# Altium PCB ADM32F036A2Q_BLDC_Demo_Rev1.0.pcbdoc (part 2 of 2)
Units mm, origin at the board's own origin, x right, y up, seen from the top; angles counter-clockwise.
Board outline 100 x 60 mm, 4 copper layers (Top Layer, S1, S2, Bottom Layer), stack 0.778 mm thick; 149 components, 80 nets, 408 pads, 387 vias.
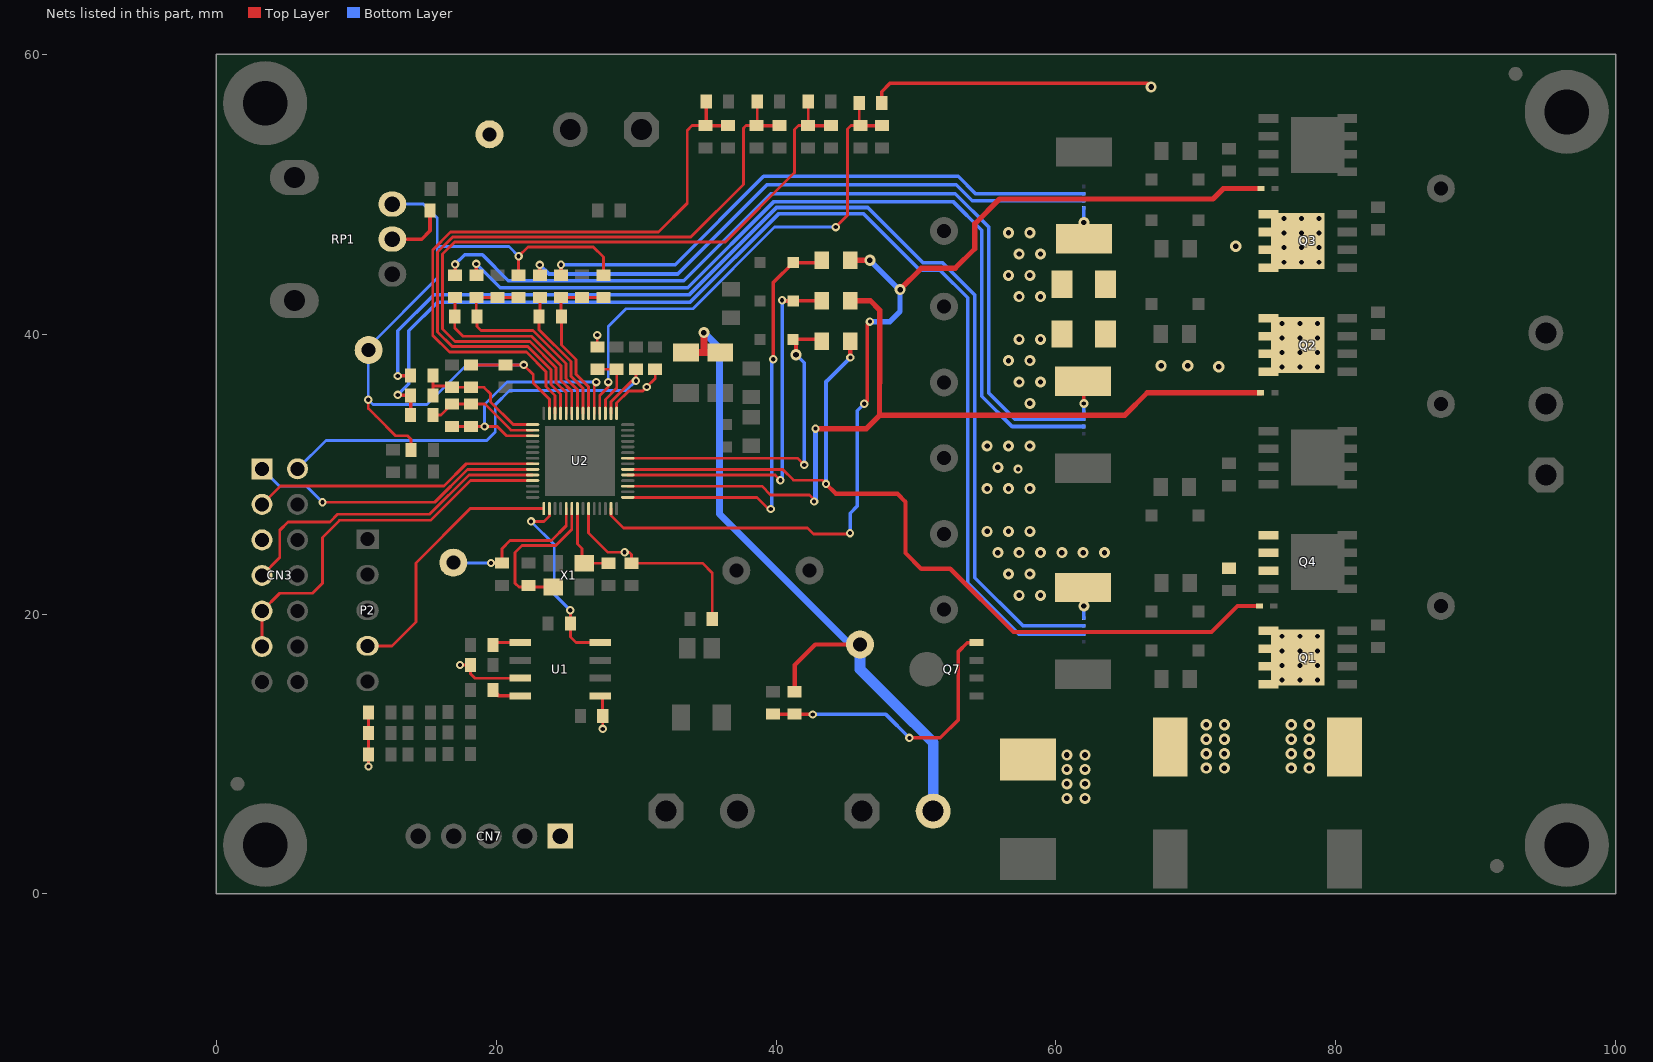
[diagram p4: the nets of this part, all layers, seen from the top]

## Via types
v1: diameter 0.6, hole 0.3, Top Layer to Bottom Layer, tented both sides, 130 vias
v2: diameter 0.787, hole 0.381, Top Layer to Bottom Layer, tented both sides, 106 vias
v3: diameter 0.66, hole 0.356, Top Layer to Bottom Layer, tented bottom, 72 vias
v4: diameter 0.8, hole 0.4, Top Layer to Bottom Layer, tented both sides, 68 vias
v5: diameter 0.635, hole 0.305, Top Layer to Bottom Layer, tented both sides, 4 vias
v6: diameter 0.787, hole 0.381, Top Layer to Bottom Layer, tented bottom, 4 vias
v7: diameter 0.5, hole 0.3, Top Layer to Bottom Layer, tented both sides, 3 vias

## Nets (pads, with @x,y where several pads share a name; then routed paths per layer and width w, separated by ;. In a path a pad name is that pad's centre, name@x,y a point inside that pad or via, vN(x,y) a via of type N, cw(c..) or ccw(c..) an arc to the next point about the centre after c; other vN are vias at no path point) (continued)
NetQ7_1: Q7.1 R5.2 R9.1 | length 20.9
  Top Layer w0.254: R9.1@39.786,12.855 R5.2@41.335,12.855 41.363,12.827 v1(42.621,12.827) ; v1(49.53,11.151) 51.74,11.151 53.035,12.446 53.035,17.323 53.67,17.958 Q7.1@54.331,17.958
  Bottom Layer w0.254: v1(42.621,12.827) 47.854,12.827 v1(49.53,11.151)
NetR44_2: R44.2 U1.1 | length 2
  Top Layer w0.203: R44.2@19.774,17.805 19.926,17.958 U1.1@21.73,17.958
NetR54_1: R54.1 RP1.2 | length 4.4
  Top Layer w0.254: RP1.2@12.588,46.787 14.681,46.787 15.278,47.384 R54.1@15.278,48.844
NetR59_2: R59.2 U1.4 | length 2.1
  Top Layer w0.254: R59.2@19.774,14.58 20.206,14.148 U1.4@21.73,14.148
OP1N: R30.1 R31.2 R33.2 U2.2 | length 8.2
  Top Layer w0.2: R31.2@15.493,34.233 16.073,34.233 R33.2@16.845,35.005 R30.1@18.217,35.005 19.202,35.005 21.07,33.137 U2.2@22.61,33.137
OP1OUT: R30.2 R33.1 U2.3 U2.47 | length 18.6
  Top Layer w0.203: R33.1@16.845,33.405 R30.2@18.217,33.405 18.221,33.401 v1(19.177,33.401) 20.083,33.401 20.087,33.405 20.755,32.737 U2.3@22.61,32.737 ; U2.47@27.01,34.337 27.01,36.433 v1(27.153,36.576)
  Bottom Layer w0.203: v1(19.177,33.401) 19.177,34.98 20.773,36.576 v1(27.153,36.576)
OP1P: C9.2 R37.2 R38.2 R40.1 U2.1 | length 10
  Top Layer w0.2: C9.2@15.493,35.63 15.493,36.297 ; R37.2@15.493,37.027 15.493,36.297 ; U2.1@22.61,33.537 21.225,33.537 19.609,35.154 19.609,35.738 19.148,36.199 R40.1@18.217,36.199 R38.2@16.845,36.199 16.747,36.297 15.493,36.297
PGA1N: C4.2 R24.1 U2.49 | length 9.6
  Top Layer w0.203: R24.1@23.125,42.611 23.125,41.299 C4.2@23.076,41.25 23.076,40.312 25.351,38.037 25.351,36.988 26.21,36.129 U2.49@26.21,34.337
PGA1P: C4.1 R17.2 R18.1 R21.1 U2.48 | length 12.1
  Top Layer w0.2: U2.48@26.61,34.337 26.6,34.347 26.6,36.239 25.705,37.135 25.705,38.184 24.676,39.213 C4.1@24.676,41.25 24.639,41.287 R21.1@24.639,42.611 R17.2@26.153,42.611 R18.1@27.667,42.611
PGA2N: C5.2 R29.1 U2.51 | length 14.6
  Top Layer w0.203: R29.1@17.069,42.611 17.069,41.275 C5.2@17.044,41.25 17.044,40.437 17.628,39.853 22.53,39.853 24.64,37.743 24.64,36.694 25.41,35.924 U2.51@25.41,34.337
PGA2P: C5.1 R25.2 R26.1 R27.1 U2.50 | length 16.5
  Top Layer w0.203: R26.1@21.611,42.611 R25.2@20.097,42.611 R27.1@18.583,42.611 18.583,41.31 C5.1@18.644,41.25 18.644,40.538 18.923,40.259 22.626,40.259 24.995,37.89 24.995,36.841 25.81,36.026 U2.50@25.81,34.337
R+: C2.2 C3.2 NT6.2 NT7.2 NT8.2 Q4.1 Q4.2 Q4.3 R14.1 RS1.1 RS2.1 RS3.2 | length 6.7
  Top Layer w0.254: RS3.2@61.944,21.896 61.995,21.845 v6(61.995,20.574) ; RS1.1@61.944,36.628 61.995,36.577 v5(61.995,35.052) ; v6(61.995,47.981) 61.995,46.816 RS2.1@62,46.811
  Bottom Layer w0.254: v6(61.995,20.574) 62,20.569 NT8.2@62,19.685 ; v5(61.995,35.052) 62,35.047 NT6.2@62,34.417 ; v6(61.995,47.981) 62,47.986 NT7.2@62,49.022
  other v2: 57.372,21.336 58.896,21.336 56.61,22.86 58.134,22.86 55.848,24.384 57.372,24.384 58.896,24.384 60.42,24.384 61.944,24.384 63.468,24.384 55.086,25.908 56.61,25.908 58.134,25.908 55.086,28.956 56.61,28.956 58.134,28.956 55.848,30.48 55.086,32.004 56.61,32.004 58.134,32.004 58.134,35.052 57.372,36.576 58.896,36.576 56.61,38.1 58.134,38.1 57.372,39.624 58.896,39.624 57.372,42.672 58.896,42.672 56.61,44.196 58.134,44.196 57.372,45.72 58.896,45.72 56.61,47.244 58.134,47.244
  other v5: 57.302,30.353
SIMO: P2.4 U2.15 | length 19.1
  Top Layer w0.203: P2.4@10.82,17.729 12.573,17.729 14.275,19.431 14.275,23.655 18.157,27.537 U2.15@23.41,27.537
SNRS3: C9.1 NT9.1 R31.1 | length 83.3
  Top Layer w0.254: v1(12.979,35.662) 13.011,35.63 C9.1@13.893,35.63 R31.1@13.893,34.233
  Bottom Layer w0.254: v1(12.979,35.662) 13.767,36.449 13.767,40.234 15.824,42.291 33.884,42.291 40.208,48.616 46.221,48.616 50.26,44.577 51.701,44.577 53.689,42.589 53.689,22.225 57.372,18.542 NT9.1@62,18.542
SNV: NT6.1 R29.2 | length 63
  Top Layer w0.254: R29.2@17.069,44.211 v1(17.069,44.983)
  Bottom Layer w0.254: v1(17.069,44.983) 17.755,45.669 19.025,45.669 20.879,43.815 33.401,43.815 39.62,50.035 52.803,50.035 55.213,47.625 55.213,35.77 57.074,33.909 NT6.1@62.001,33.909
SNW: NT7.1 R24.2 | length 43
  Top Layer w0.254: R24.2@23.125,44.211 v1(23.125,44.947)
  Bottom Layer w0.254: v1(23.125,44.947) 23.774,44.298 32.981,44.298 39.356,50.673 52.883,50.673 54.026,49.53 NT7.1@62,49.53
SPRS3: NT8.1 R37.1 | length 81
  Top Layer w0.254: v1(12.979,37.008) 12.998,37.027 R37.1@13.893,37.027
  Bottom Layer w0.254: v1(12.979,37.008) 12.979,40.234 15.545,42.799 33.781,42.799 40.029,49.047 46.552,49.047 50.514,45.085 51.911,45.085 54.197,42.799 54.197,22.606 57.626,19.177 NT8.1@62,19.177
SPV: NT4.1 R27.2 | length 61.1
  Top Layer w0.254: R27.2@18.583,44.211 v1(18.583,45.019)
  Bottom Layer w0.254: v1(18.583,45.019) 20.295,43.307 33.688,43.307 39.853,49.472 52.647,49.472 54.705,47.415 54.705,35.56 56.864,33.401 NT4.1@62.001,33.401
SPW: NT5.1 R21.2 | length 41.2
  Top Layer w0.254: R21.2@24.639,44.211 v1(24.639,44.959)
  Bottom Layer w0.254: v1(24.639,44.959) 32.798,44.959 39.109,51.27 53.023,51.27 54.254,50.038 NT5.1@62,50.038
STB: R60.2 U1.8 U2.16 | length 13.7
  Top Layer w0.203: v1(22.504,26.619) 23.414,26.619 23.81,27.015 U2.16@23.81,27.537 ; v1(25.298,20.269) 25.311,20.257 R60.2@25.311,19.329 25.311,18.352 25.705,17.958 U1.8@27.445,17.958
  Bottom Layer w0.203: v1(22.504,26.619) 24.155,24.968 24.155,21.412 v1(25.298,20.269)
TCK: CN3.9 CN3.11 U2.11 | length 27.7
  Top Layer w0.2: CN3.11@3.277,17.678 CN3.9@3.277,20.218 4.547,21.488 6.883,21.488 7.595,22.2 7.595,25.476 8.814,26.695 15.32,26.695 18.162,29.537 U2.11@22.61,29.537
TDI: CN3.3 U2.8 | length 20.5
  Top Layer w0.2: CN3.3@3.277,27.838 4.597,29.159 16.288,29.159 17.866,30.737 U2.8@22.61,30.737
TDO: CN3.7 U2.10 | length 23.5
  Top Layer w0.2: CN3.7@3.277,22.758 4.547,24.028 4.547,25.984 5.131,26.568 8.121,26.568 8.68,27.127 15.253,27.127 18.063,29.937 U2.10@22.61,29.937
TMS: CN3.1 U2.9 | length 21.3
  Top Layer w0.2: v1(7.595,27.991) 15.618,27.991 17.965,30.337 U2.9@22.61,30.337
  Bottom Layer w0.2: CN3.1@3.277,30.378 4.521,29.134 6.452,29.134 v1(7.595,27.991)
TRSTn: CN3.2 R22.2 U2.44 | length 32
  Top Layer w0.2: U2.44@28.21,34.337 28.21,35.169 29.71,36.669 v1(29.989,36.669) R22.2@29.989,37.489
  Bottom Layer w0.2: CN3.2@5.817,30.378 7.849,32.41 19.329,32.41 19.939,33.02 19.939,34.95 20.961,35.973 29.293,35.973 v1(29.989,36.669)
U: C12.1 NT1.1 U2.34 | length 63.8
  Top Layer w0.2: U2.34@29.41,30.337 40.478,30.337 41.25,29.566 43.307,29.566 v1(43.574,29.299)
  Top Layer w0.305: v1(43.574,29.299) 44.277,28.596 48.671,28.596 49.251,28.016 49.251,24.359 50.368,23.241 52.451,23.241 56.972,18.72 71.12,18.72 72.974,20.574 NT1.1@74.549,20.574 ; C12.1@45.307,39.497 45.307,38.335 v1(45.314,38.329)
  Bottom Layer w0.305: v1(43.574,29.299) 43.574,36.589 v1(45.314,38.329)
V: C13.1 NT2.1 U2.31 | length 61.9
  Top Layer w0.2: U2.31@29.41,29.137 38.995,29.137 39.618,28.515 42.402,28.515 42.723,28.194 v1(42.723,28.042)
  Top Layer w0.381: v1(42.824,33.249) 46.457,33.249 47.389,34.181 ; C13.1@45.307,42.386 46.742,42.386 47.404,41.724 47.404,36.525 47.389,36.509 47.389,34.181 ; NT2.1@74.625,35.814 66.523,35.814 64.922,34.214 47.422,34.214 47.389,34.181
  Bottom Layer w0.381: v1(42.723,28.042) 42.824,28.143 v1(42.824,33.249)
VBU: C12.2 D8.K U2.36 | length 24.2
  Top Layer w0.2: U2.36@29.41,31.137 41.532,31.137 v1(42.012,30.658)
  Top Layer w0.254: v4(41.427,38.532) 41.427,39.407 D8.K@41.21,39.624 43.148,39.624 C12.2@43.275,39.497
  Bottom Layer w0.254: v4(41.427,38.532) 42.012,37.948 v1(42.012,30.658)
VBV: C13.2 D9.K U2.33 | length 26.8
  Top Layer w0.2: U2.33@29.41,29.937 39.938,29.937 v1(40.31,29.566)
  Top Layer w0.254: v1(40.437,42.418) 40.488,42.367 D9.K@41.224,42.367 41.243,42.386 C13.2@43.275,42.386
  Bottom Layer w0.254: v1(40.31,29.566) 40.437,29.693 v1(40.437,42.418)
VBW: C15.2 D11.K U2.29 | length 31
  Top Layer w0.2: U2.29@29.41,28.337 38.643,28.337 39.472,27.508 v1(39.624,27.508)
  Top Layer w0.254: v1(39.807,38.206) 39.807,43.693 D11.K@41.224,45.11 43.11,45.11 C15.2@43.275,45.276
  Bottom Layer w0.254: v1(39.624,27.508) 39.634,27.508 39.68,27.462 39.68,38.079 v1(39.807,38.206)
VDD: C21.1 TP14.1 U2.19 | length 11
  Top Layer w0.203: v1(19.634,23.647) C21.1@20.422,23.647 20.422,24.663 21.006,25.248 23.952,25.248 25.01,26.305 U2.19@25.01,27.537
  Bottom Layer w0.203: TP14.1@16.942,23.673 16.967,23.647 v1(19.634,23.647)
VDD5V: CN3.5
VDDA: C8.1 R18.2 R26.2 R40.2 R48.2 RP1.3 TP15.1 U2.55 | length 59.8
  Top Layer w0.2: v1(10.871,35.306) 10.871,34.678 11.41,34.139 11.413,34.139 12.811,32.741 13.665,32.741 13.918,32.488 R48.2@13.918,31.725 ; R40.2@18.217,37.799 C8.1@20.676,37.799 v1(21.971,37.799) 22.657,37.113 22.657,36.5 23.81,35.347 U2.55@23.81,34.337 ; R26.2@21.611,44.211 v1(21.611,45.563) 22.281,46.233 26.945,46.233 27.667,45.51 R18.2@27.667,44.211
  Bottom Layer w0.2: RP1.3@12.588,49.287 14.797,49.287 15.799,48.285 15.799,46.253 ; v1(21.611,45.563) 20.921,46.253 15.799,46.253 ; v1(21.971,37.799) 17.885,37.799 15.061,34.975 11.202,34.975 v1(10.871,35.306) 10.871,39.091 15.799,44.018 15.799,46.253
VDDIO: C11.1 C16.1 C29.1 C32.1 CN7.1 R4.1 R43.1 R49.1 R51.1 R52.1 TP13.1 U1.3 U1.5 U2.23 U2.43 | length 32.8
  Top Layer w0.2: v1(10.884,9.106) R49.1@10.884,9.96 R51.1@10.884,11.506 R52.1@10.884,12.982 ; v1(17.424,16.358) C32.1@18.174,16.358 18.174,15.735 18.491,15.418 U1.3@21.73,15.418 ; U2.23@26.61,27.537 26.61,25.791 27.991,24.409 v1(29.185,24.409) 29.515,24.409 29.667,24.257 C16.1@29.667,23.635 34.735,23.635 35.448,22.921 R4.1@35.448,19.653 ; R43.1@27.229,39.089 v1(27.229,39.929) ; U1.5@27.445,14.148 27.61,13.983 C29.1@27.61,12.421 ; v1(27.622,11.798) C29.1@27.622,12.725 ; U2.43@28.61,34.337 28.61,35.071 29.48,35.941 30.48,35.941 v1(30.759,36.22) 31.369,36.83 C11.1@31.369,37.489
VM: C2.1 C3.1 CN1.2 D4.2 E1.1 E2.1 Q1.5 Q1.6 Q1.7 Q1.8 Q1.9 Q2.5 Q2.6 Q2.7 Q2.8 Q2.9 Q3.5 Q3.6 Q3.7 Q3.8 Q3.9 R5.1 R34.2 R41.2 R50.1 TP1.1 | length 74.2
  Top Layer w0.254: R50.1@47.55,56.515 47.55,57.329 48.133,57.912 66.548,57.912 v4(66.802,57.658) ; Q3.6@75.302,47.244 Q3.9@76.284,46.262
  Top Layer w0.3: R5.1@41.335,14.455 41.335,16.367 42.799,17.831 TP1.1@45.999,17.831
  Top Layer w0.5: R41.2@33.579,38.686 34.823,38.686 ; v4(34.849,40.107) 34.849,38.686 R34.2@36.017,38.686
  Bottom Layer w0.5: v4(34.849,40.107) 35.966,38.989 35.966,27.153 45.288,17.831 TP1.1@45.999,17.831
  Bottom Layer w0.762: TP1.1@45.999,17.831 45.999,16.053 49.865,12.187 49.871,12.187 51.232,10.826 CN1.2@51.232,5.918
  other v3: 76.168,15.291 77.425,15.291 78.683,15.291 76.168,16.332 77.425,16.332 78.683,16.332 76.168,17.374 77.425,17.374 78.683,17.374 76.168,18.415 77.425,18.415 78.683,18.415 76.168,37.643 77.425,37.643 78.683,37.643 76.168,38.684 77.425,38.684 78.683,38.684 76.168,39.726 77.425,39.726 78.683,39.726 76.168,40.767 77.425,40.767 78.683,40.767 76.295,45.136 77.552,45.136 78.81,45.136 76.295,46.177 77.552,46.177 78.81,46.177 76.295,47.219 77.552,47.219 78.81,47.219 76.295,48.26 77.552,48.26 78.81,48.26
  other v4: 60.782,6.833 62.078,6.833 60.782,7.866 62.078,7.866 60.782,8.898 62.078,8.898 70.739,8.992 72.034,8.992 76.81,8.992 78.105,8.992 60.782,9.931 62.078,9.931 70.739,10.025 72.034,10.025 76.81,10.025 78.105,10.025 70.739,11.057 72.034,11.057 76.81,11.057 78.105,11.057 70.739,12.09 72.034,12.09 76.81,12.09 78.105,12.09 71.628,37.668 67.513,37.744 69.418,37.744 72.847,46.279
VSENU: C14.2 R19.2 R23.1 U2.54 | length 48.1
  Top Layer w0.203: U2.54@24.21,34.337 24.21,35.619 23.571,36.258 23.571,37.307 22.167,38.711 16.661,38.711 15.47,39.902 15.47,46.014 16.751,47.295 31.598,47.295 33.655,49.352 33.655,54.559 33.998,54.902 R23.1@34.97,54.902
  Top Layer w0.254: R19.2@35.014,56.604 35.014,54.946 R23.1@34.97,54.902 C14.2@36.576,54.902
VSENV: C19.2 R32.2 R39.1 U2.53 | length 50.6
  Top Layer w0.203: U2.53@24.61,34.337 24.61,35.722 23.932,36.4 23.932,37.45 22.264,39.118 16.864,39.118 15.826,40.156 15.826,45.867 16.898,46.939 33.909,46.939 37.668,50.698 37.668,54.712 37.859,54.902 R39.1@38.608,54.902 38.659,54.953 R32.2@38.659,56.604
  Top Layer w0.254: R39.1@38.608,54.902 C19.2@40.246,54.902
VSENVM: C30.2 R50.2 R58.1 U2.46 | length 37.2
  Top Layer w0.203: U2.46@27.41,34.337 27.41,35.614 28.016,36.22 v1(28.016,36.576) ; v1(44.272,47.65) 45.11,48.489 45.11,54.661 45.352,54.902 C30.2@46.041,54.902 45.95,54.993 R50.2@45.95,56.515
  Top Layer w0.254: C30.2@46.041,54.902 R58.1@47.565,54.902
  Bottom Layer w0.203: v1(28.016,36.576) 28.016,40.538 29.286,41.808 34.061,41.808 39.903,47.65 v1(44.272,47.65)
VSENW: C22.2 R45.2 R46.1 U2.52 | length 53.2
  Top Layer w0.2: U2.52@25.01,34.337 25.01,35.823 24.286,36.547 24.286,37.596 22.41,39.472 17.069,39.472 16.18,40.361 16.18,45.72 17.045,46.585 36.374,46.585 41.326,51.537 41.326,54.61 41.618,54.902 R46.1@42.291,54.902 42.305,54.916 R45.2@42.305,56.604
  Top Layer w0.254: R46.1@42.291,54.902 C22.2@43.942,54.902
W: C15.1 NT3.1 U2.27 | length 72.1
  Top Layer w0.2: U2.27@28.21,27.537 28.21,27.035 29.097,26.148 42.255,26.148 42.691,25.711 45.218,25.711 v1(45.288,25.781)
  Top Layer w0.254: v1(46.304,35.027) 46.533,35.255 46.533,40.716 v1(46.711,40.894)
  Top Layer w0.381: C15.1@45.307,45.276 v4(46.704,45.276) ; v4(48.863,43.18) 50.387,44.704 52.8,44.704 54.197,46.101 54.197,47.879 55.975,49.657 71.215,49.657 71.958,50.4 NT3.1@74.644,50.4
  Bottom Layer w0.254: v1(45.288,25.781) 45.288,26.513 45.293,26.518 45.293,27.21 45.801,27.718 45.801,34.523 v1(46.304,35.027)
  Bottom Layer w0.381: v4(46.704,45.276) 48.8,43.18 v4(48.863,43.18) 48.863,41.624 48.133,40.894 v1(46.711,40.894)
X1: C10.2 U2.21 X1.3 | length 5.9
  Top Layer w0.203: U2.21@25.81,27.537 25.81,25.016 26.146,24.679 26.146,23.784 X1.3@26.297,23.634 ; X1.3@26.297,23.634 C10.2@28.042,23.635
X2: C17.2 U2.20 X1.1 | length 11.3
  Top Layer w0.203: X1.1@24.097,21.934 21.627,21.934 21.361,22.2 21.361,24.409 21.844,24.892 24.257,24.892 25.41,26.045 U2.20@25.41,27.537
XRS: C28.2 R43.2 U2.45 | length 4.9
  Top Layer w0.203: R43.2@27.229,37.489 C28.2@28.609,37.489 28.621,37.477 28.621,36.139 27.81,35.328 U2.45@27.81,34.337
pads on no net: CN3.6 CN3.13 CN3.14 M1.0 M2.0 M3.0 RP1.0 U2.6

## Polygon pours and split planes (outlines as drawn)
GND on Top Layer "i" (solid, remove dead copper, pour order 122): 100,51.613 92.745,51.613 91.135,53.222 91.135,56.801 89.745,58.191 56.261,58.191 55.448,57.379 55.448,52.73 51.943,49.225 38.735,49.225 36.22,46.711 36.22,33.223 34.976,31.979 32.69,31.979 29.845,29.134 29.845,0 29.87,-0.025 99.975,-0.025 100,0 100,51.562 99.974,51.587
VM on Top Layer "Top Overlay-No Net" (solid, remove dead copper, pour order 92): 49.428,4.521 60.909,4.521 63.373,6.985 85.852,6.985 85.979,7.112 85.954,7.137 85.954,13.487 79.426,13.487 79.324,13.589 79.324,19.538 73.54,19.538 71.171,17.168 71.171,14.199 65.989,14.199 65.989,14.173 65.278,13.462 65.278,12.573 60.198,12.573 59.207,11.582 56.312,11.582 55.575,10.846 50.846,10.846 49.428,9.428
R+ on Top Layer "i" (solid, remove dead copper, pour order 64): 66.98,45.517 66.98,48.082 66.243,48.819 56.28,48.819 53.594,46.133 53.594,24.606 55.042,23.158 55.042,21.38 56.864,19.558 64.865,19.558 65.779,20.472 66.65,20.472 66.65,22.53 67.031,22.911 70.002,22.911 70.028,22.885 73.025,22.885 73.304,22.606 76.149,22.606 76.175,22.581 76.175,28.753 76.098,28.677 69.875,28.677 69.647,28.448 69.723,28.372 69.723,26.695 70.155,26.264 59.157,26.264 59.131,26.289 59.131,34.798 59.106,34.823 64.567,34.823 64.618,34.773 64.618,38.075 64.77,38.227 61.468,38.227 61.417,38.278 61.417,45.339 66.777,45.339 66.929,45.491
MOTW on Top Layer "i" (solid, remove dead copper, pour order 26): 76.549,50.218 76.549,58.54 89.469,58.54 89.469,58.467 91.147,56.79 91.147,53.211 93.964,50.394 95.225,50.394 95.225,50.371 98.259,47.337 98.259,38.608 93.694,38.608 93.694,41.656 91.916,43.434 79.978,43.434 79.978,50.184 79.985,50.19 76.577,50.19
NetNT4_2 on Top Layer "i" (solid, remove dead copper, pour order 16): 76.073,35.56 66.954,35.56 65.176,33.782 59.309,33.782 59.309,27.051 66.825,27.051 67.484,27.71 67.484,29.638 67.691,29.845 76.073,29.845
VM on Top Layer "i" (solid, remove dead copper, pour order 14): 79.629,49.403 79.629,36.576 64.897,36.576 64.77,36.449 64.77,38.227 62.484,38.227 62.357,38.354 62.357,45.085 70.104,45.085 70.866,45.847 70.866,48.133 71.247,48.133 72.39,49.276 79.375,49.276 79.502,49.403
NetNT5_2 on Top Layer "i" (solid, remove dead copper, pour order 12): 76.2,52.451 76.2,57.277 75.413,58.064 55.474,58.064 55.474,51.689 66.294,51.689 67.056,52.451 67.056,53.721 70.104,53.721 70.104,52.451
MOTU on Top Layer "i" (solid, remove dead copper, pour order 4): 79.724,14.224 99.873,14.224 100,14.351 100,31.674 91.459,31.674 90.5,30.715 90.5,28.854 87.833,26.187 76.549,26.187 76.549,20.32 76.93,19.939 79.724,19.939
MOTV on Top Layer "i" (solid, remove dead copper, pour order 2): 79.978,43.053 91.916,43.053 93.44,41.529 93.44,38.227 98.266,38.227 98.266,32.131 91.161,32.131 90.068,31.039 90.068,29.083 87.655,26.67 76.549,26.67 76.549,36.195 79.978,36.195
NetCN1_1 on Top Layer "Top Overlay-No Net" (solid, remove dead copper, pour order 94): 61.011,4.039 61.036,4.064 61.036,-0.051 42.647,-0.051 42.596,0 42.621,0.025 42.621,11.76 49.352,18.491 52.603,18.491 52.603,12.954 49.251,12.954 48.844,12.548 48.844,4.039
VDDIO on Top Layer "Top Overlay-No Net" (solid, remove dead copper, pour order 124): 24.155,23.876 29.515,23.912 29.515,21.819 24.155,21.819
GND on Top Layer "i" (solid, remove dead copper, pour order 126): 98.266,32.131 98.291,32.106 100.051,32.106 100.076,32.131 100.076,60.02 100.025,60.071 0.102,60.071 0.102,0.102 0.203,0 29.896,0 29.947,0.051 30.429,0.051 30.373,0.107 30.373,11.228 30.196,11.405 29.489,11.405 29.515,11.43 29.515,29.261 32.563,32.309 35.306,32.309 35.916,32.918 35.916,46.761 38.659,49.505 51.765,49.505 55.118,52.857 55.118,57.531 56.109,58.522 89.992,58.522 91.491,57.023 91.491,53.365 94.107,50.749 95.428,50.749 98.577,47.6 98.577,32.512 98.603,32.487
GND on Bottom Layer "i" (solid, remove dead copper, pour order 110): 100,51.613 92.745,51.613 91.135,53.222 91.135,56.801 89.745,58.191 56.261,58.191 55.448,57.379 55.448,52.73 51.943,49.225 38.735,49.225 36.22,46.711 36.22,33.223 34.976,31.979 32.69,31.979 29.845,29.134 29.845,0 29.87,-0.025 99.975,-0.025 100,0 100,51.562 99.974,51.587
GND on Bottom Layer "i" (solid, remove dead copper, pour order 84): 98.266,32.131 98.291,32.106 100.051,32.106 100.076,32.131 100.076,60.02 100.025,60.071 0.102,60.071 0.102,0.102 0.203,0 29.896,0 29.947,0.051 30.429,0.051 30.373,0.107 30.373,11.228 30.196,11.405 29.489,11.405 29.515,11.43 29.515,29.261 32.563,32.309 34.9,32.309 35.916,33.325 35.916,46.761 38.659,49.505 54.381,49.505 55.118,50.241 55.118,57.531 56.109,58.522 89.992,58.522 91.491,57.023 91.491,53.365 94.107,50.749 95.428,50.749 98.577,47.6 98.577,32.512 98.603,32.487
MOTW on Bottom Layer "i" (solid, remove dead copper, pour order 28): 76.549,50.218 76.549,58.191 89.745,58.191 91.147,56.79 91.147,53.211 93.964,50.394 95.225,50.394 95.225,50.371 98.259,47.337 98.259,38.608 93.694,38.608 93.694,41.656 91.916,43.434 79.978,43.434 79.978,50.184 76.577,50.19
MOTV on Bottom Layer "i" (solid, remove dead copper, pour order 34): 79.978,43.053 91.916,43.053 93.44,41.529 93.44,38.227 98.266,38.227 98.266,32.131 91.161,32.131 90.068,31.039 90.068,29.083 87.655,26.67 76.549,26.67 76.549,36.195 79.978,36.195
MOTU on Bottom Layer "i" (solid, remove dead copper, pour order 40): 79.724,14.224 99.873,14.224 100,14.351 100,31.674 91.459,31.674 90.5,30.715 90.5,28.854 87.833,26.187 76.549,26.187 76.549,20.32 76.93,19.939 79.724,19.939
VM on Bottom Layer "i" (solid, remove dead copper, pour order 46): 85.979,13.64 85.979,7.01 63.068,7.01 61.087,5.029 56.134,5.029 56.159,5.055 56.159,8.534 60.249,12.624 65.329,12.624 65.329,58.166 76.225,58.166 76.225,49.809 79.629,49.809 79.654,49.784 79.654,36.551 76.302,36.551 76.276,36.576 76.276,20.015 76.657,19.634 79.477,19.634 79.477,13.741 85.877,13.741
NetNT5_2 on Bottom Layer "i" (solid, remove dead copper, pour order 56): 64.795,58.191 56.261,58.191 55.448,57.379 55.448,51.714 55.55,51.613 64.795,51.613 64.821,51.587
NetNT4_2 on Bottom Layer "i" (solid, remove dead copper, pour order 62): 64.872,33.426 64.897,33.401 64.897,27.915 64.465,27.483 59.309,27.483 59.309,33.122 59.385,33.198 61.62,33.198 61.824,33.401 64.846,33.401
R+ on Bottom Layer "i" (solid, remove dead copper, pour order 70): 56.185,48.336 55.27,47.422 55.27,44.602 53.67,43.002 53.67,25.095 54.483,24.282 54.483,22.428 56.794,20.117 64.846,20.117 64.846,26.772 64.745,26.873 58.953,26.873 58.953,33.198 59.715,33.96 64.872,33.96 64.821,34.011 64.821,48.336
VM on Bottom Layer "Top Overlay-No Net" (solid, remove dead copper, pour order 104): 49.428,4.521 60.909,4.521 63.373,6.985 85.852,6.985 85.979,7.112 85.954,7.137 85.954,13.487 79.426,13.487 79.324,13.589 79.324,19.538 73.54,19.538 71.171,17.168 71.171,14.199 65.989,14.199 65.989,14.173 65.278,13.462 65.278,12.573 60.198,12.573 59.207,11.582 56.312,11.582 55.575,10.846 50.846,10.846 49.428,9.428
GND on S1 "i" (solid, remove dead copper, pour order 108): 100,51.613 92.745,51.613 91.135,53.222 91.135,56.801 89.745,58.191 56.261,58.191 55.448,57.379 55.448,52.73 51.943,49.225 38.735,49.225 36.22,46.711 36.22,33.223 34.976,31.979 32.69,31.979 29.845,29.134 29.845,0 29.87,-0.025 99.975,-0.025 100,0 100,51.562 99.974,51.587
GND on S1 "i" (solid, remove dead copper, pour order 80): 98.266,32.131 98.291,32.106 100.051,32.106 100.076,32.131 100.076,60.02 100.025,60.071 0.102,60.071 0.102,0.102 0.203,0 29.896,0 29.947,0.051 30.429,0.051 30.373,0.107 30.373,11.228 30.196,11.405 29.489,11.405 29.515,11.43 29.515,29.261 32.563,32.309 34.9,32.309 35.916,33.325 35.916,46.761 38.659,49.505 51.765,49.505 55.118,52.857 55.118,57.531 56.109,58.522 89.992,58.522 91.491,57.023 91.491,53.365 94.107,50.749 95.428,50.749 98.577,47.6 98.577,32.512 98.603,32.487
MOTW on S1 "i" (solid, remove dead copper, pour order 30): 76.549,50.218 76.549,58.191 89.745,58.191 91.147,56.79 91.147,53.211 93.964,50.394 95.225,50.394 95.225,50.371 98.259,47.337 98.259,38.608 93.694,38.608 93.694,41.656 91.916,43.434 79.978,43.434 79.978,50.184 76.577,50.19
MOTV on S1 "i" (solid, remove dead copper, pour order 36): 79.978,43.053 91.916,43.053 93.44,41.529 93.44,38.227 98.266,38.227 98.266,32.131 91.161,32.131 90.068,31.039 90.068,29.083 87.655,26.67 76.549,26.67 76.549,36.195 79.978,36.195
MOTU on S1 "i" (solid, remove dead copper, pour order 42): 79.724,14.224 99.873,14.224 100,14.351 100,31.674 91.459,31.674 90.5,30.715 90.5,28.854 87.833,26.187 76.549,26.187 76.549,20.32 76.93,19.939 79.724,19.939
VM on S1 "i" (solid, remove dead copper, pour order 48): 85.979,13.64 85.979,7.01 63.068,7.01 61.087,5.029 56.134,5.029 56.159,5.055 56.159,8.534 60.249,12.624 65.329,12.624 65.329,58.166 76.225,58.166 76.225,49.809 79.629,49.809 79.654,49.784 79.654,36.551 76.302,36.551 76.276,36.576 76.276,20.015 76.657,19.634 79.477,19.634 79.477,13.741 85.877,13.741
NetNT5_2 on S1 "i" (solid, remove dead copper, pour order 52): 64.795,58.191 56.261,58.191 55.448,57.379 55.448,51.714 55.55,51.613 64.795,51.613 64.821,51.587
NetNT4_2 on S1 "i" (solid, remove dead copper, pour order 58): 64.846,33.452 59.563,33.452 59.309,33.198 59.309,27.483 64.389,27.483 64.846,27.94
R+ on S1 "i" (solid, remove dead copper, pour order 66): 56.185,48.336 55.27,47.422 55.27,44.602 53.67,43.002 53.67,25.095 55.245,23.52 55.245,21.666 56.794,20.117 64.846,20.117 64.846,26.772 64.745,26.873 58.953,26.873 58.953,33.198 59.715,33.96 64.872,33.96 64.821,34.011 64.821,48.336
VM on S1 "Top Overlay-No Net" (solid, remove dead copper, pour order 98): 49.428,4.521 60.909,4.521 63.373,6.985 85.852,6.985 85.979,7.112 85.954,7.137 85.954,13.487 79.426,13.487 79.324,13.589 79.324,19.538 73.54,19.538 71.171,17.168 71.171,14.199 65.989,14.199 65.989,14.173 65.278,13.462 65.278,12.573 60.198,12.573 59.207,11.582 56.312,11.582 55.575,10.846 50.846,10.846 49.428,9.428
GND on S2 "i" (solid, remove dead copper, pour order 106): 100,51.613 92.745,51.613 91.135,53.222 91.135,56.801 89.745,58.191 56.261,58.191 55.448,57.379 55.448,52.73 51.943,49.225 38.735,49.225 36.22,46.711 36.22,33.223 34.976,31.979 32.69,31.979 29.845,29.134 29.845,0 29.87,-0.025 99.975,-0.025 100,0 100,51.562 99.974,51.587
VDDIO on S2 "i" (solid, remove dead copper, pour order 86): 98.266,32.131 98.291,32.106 100.051,32.106 100.076,32.131 100.076,60.02 100.025,60.071 0.102,60.071 0.102,0.102 0.203,0 29.896,0 29.947,0.051 30.429,0.051 30.373,0.107 30.373,11.228 30.196,11.405 29.489,11.405 29.515,11.43 29.515,29.261 32.563,32.309 34.9,32.309 35.916,33.325 35.916,46.761 38.659,49.505 51.765,49.505 55.118,52.857 55.118,57.531 56.109,58.522 89.992,58.522 91.491,57.023 91.491,53.365 94.107,50.749 95.428,50.749 98.577,47.6 98.577,32.512 98.603,32.487
MOTW on S2 "i" (solid, remove dead copper, pour order 32): 76.549,50.218 76.549,58.191 89.745,58.191 91.147,56.79 91.147,53.211 93.964,50.394 95.225,50.394 95.225,50.371 98.259,47.337 98.259,38.608 93.694,38.608 93.694,41.656 91.916,43.434 79.978,43.434 79.978,50.184 76.577,50.19
MOTV on S2 "i" (solid, remove dead copper, pour order 38): 79.978,43.053 91.916,43.053 93.44,41.529 93.44,38.227 98.266,38.227 98.266,32.131 91.161,32.131 90.068,31.039 90.068,29.083 87.655,26.67 76.549,26.67 76.549,36.195 79.978,36.195
MOTU on S2 "i" (solid, remove dead copper, pour order 44): 79.724,14.224 99.873,14.224 100,14.351 100,31.674 91.459,31.674 90.5,30.715 90.5,28.854 87.833,26.187 76.549,26.187 76.549,20.32 76.93,19.939 79.724,19.939
VM on S2 "i" (solid, remove dead copper, pour order 50): 85.979,13.64 85.979,7.01 63.068,7.01 61.087,5.029 56.134,5.029 56.159,5.055 56.159,8.534 60.249,12.624 65.329,12.624 65.329,58.166 76.225,58.166 76.225,49.809 79.629,49.809 79.654,49.784 79.654,36.551 76.302,36.551 76.276,36.576 76.276,20.015 76.657,19.634 79.477,19.634 79.477,13.741 85.877,13.741
NetNT5_2 on S2 "i" (solid, remove dead copper, pour order 54): 64.795,58.191 56.261,58.191 55.448,57.379 55.448,51.714 55.55,51.613 64.795,51.613 64.821,51.587
NetNT4_2 on S2 "i" (solid, remove dead copper, pour order 60): 64.846,33.452 59.563,33.452 59.309,33.198 59.309,27.483 64.389,27.483 64.846,27.94
R+ on S2 "i" (solid, remove dead copper, pour order 68): 56.185,48.336 55.27,47.422 55.27,44.602 53.67,43.002 53.67,25.095 55.245,23.52 55.245,21.666 56.794,20.117 64.846,20.117 64.846,26.772 64.745,26.873 58.953,26.873 58.953,33.198 59.715,33.96 64.872,33.96 64.821,34.011 64.821,48.336
VM on S2 "Top Overlay-No Net" (solid, remove dead copper, pour order 102): 49.428,4.521 60.909,4.521 63.373,6.985 85.852,6.985 85.979,7.112 85.954,7.137 85.954,13.487 79.426,13.487 79.324,13.589 79.324,19.538 73.54,19.538 71.171,17.168 71.171,14.199 65.989,14.199 65.989,14.173 65.278,13.462 65.278,12.573 60.198,12.573 59.207,11.582 56.312,11.582 55.575,10.846 50.846,10.846 49.428,9.428

## Keep-outs
Keep-Out Layer:
  the board outline again, w0.2

## Other copper
Top Layer:
  pour cut-out: 37.433,45.974 37.494,46.035 45.561,45.974 45.561,45.429 45.561,38.227 37.588,38.227
  pour cut-out: 53.402,12.753 53.395,11.176 49.288,11.176 49.233,11.12 49.037,11.316 49.037,12.753
  pour cut-out: 55.285,17.8 55.285,20.331 53.899,21.717 47.168,21.717 47.142,21.692 47.345,21.489 47.345,17.47 54.955,17.47
  text "Advchip" at 86.868,10.795 h2.4
S1:
  pour cut-out: 29.515,26.797 27.762,26.797 27.762,25.504 28.361,24.905 28.373,24.917 29.515,24.917
  pour cut-out: 29.515,26.797 27.559,26.797 27.559,25.707 28.361,24.905 28.373,24.917 29.515,24.917
Bottom Layer:
  pour cut-out: 29.515,26.797 27.559,26.797 27.559,25.707 28.361,24.905 28.373,24.917 29.515,24.917

## Silkscreen, mask and mechanical layers (free items; w line width, h text height)
Top Overlay:
  circle w0.3: c95.6,22.318 r2.5
  lines w0.1: 6.528,6.401 6.528,9.296 6.934,9.703 9.804,9.703 10.135,10.033 10.135,13.335 ; 9.474,6.274 9.474,8.484 10.079,9.088 12.619,9.088 12.979,9.449 ; 13.106,13.462 13.36,13.716 22.327,13.716 ; 13.538,9.22 23.825,9.22 24.13,9.525 24.13,13.233
  lines w0.254: -10,0 2,0 ; -10,60 2,60 ; -4.508,1.524 -4,0 ; -4.508,58.476 -4,60 ; -4,24.95 -4,0 ; -4,35.05 -4,60 ; -3.492,1.524 -4,0 ; -3.492,58.476 -4,60 ; -0.099,-8.267 -0.099,-0.267 ; 1.425,-4.775 -0.099,-4.267 ; 1.425,-3.759 -0.099,-4.267 ; 3.788,38.652 cw(c5.588,38.676) 4.033,37.769 ; 4.013,36.923 4.013,37.787 4.83,37.696 ; 44.253,-4.267 -0.099,-4.267 ; 55.55,-4.267 99.901,-4.267 ; 98.377,-4.775 99.901,-4.267 ; 98.377,-3.759 99.901,-4.267 ; 99.901,-8.267 99.901,-0.267
  lines w0.3: 94.254,24.376 97.099,20.388
  text "ADM32F036A2Q_BLDC_Demo" at 51.867,57.201 h2
  text "GND" at 25.705,48.92 h1 r180
  text "LIN_BUS" at 34.823,48.92 h1 r180
  text "1" at 88.011,46.101 h2.5
  text "0-3V" at 7.849,40.437 h1 r270
  text "+" at 4.851,39.438 h1.8 r270
  text "JTAG" at 9.55,35.458 h1.52 r270
  text "SPI" at 9.881,27.229 h1
  text "60 (mm)" at -2.687,25.204 h1.52 r90
  text "CLK" at 12.37,24.13 h1
  text "STE" at 12.37,21.838 h1
  text "Pb" at 93.923,21.133 h2.54
  text "MI" at 12.37,19.545 h1
  text "MO" at 12.37,17.253 h1
  text "24/09/04" at 89.052,15.215 h1.5
  text "GND" at 12.37,14.961 h1
  text "L" at 30.963,11.735 h1
  text "H" at 37.973,11.735 h1
  text "GND" at 44.78,11.481 h1.2
  text "VM" at 50.176,11.481 h1.2
  text "G" at 13.995,7.95 h1
  text "C" at 16.516,7.95 h1
  text "B" at 19.037,7.95 h1
  text "A" at 21.558,7.95 h1
  text "V" at 24.079,7.95 h1
  text "HALL" at 9.322,4.699 h1
  text "100 (mm)" at 44.507,-5.58 h1.52
  text "GND" at 62.179,-19.761 h1.52
  text "VM" at 67.31,-19.761 h1.52
Bottom Overlay:
  circle w0.2: c63.906,35.179 r1.25
  text "www.advancechip.com" at 58.75,49.74 h1.52 r90
  text "Contact:0731-88731029" at 61.697,49.74 h1.52 r90
  text "Powered by" at 64.491,49.74 h1.52 r90
  text "N" at 75.946,38.329 h3 r90
  text "C" at 64.668,35.744 h1.52 r90
  text "Advancechip Co.,LTD" at 64.567,33.458 h1.52 r90
Top Solder:
  rectangle: 86.328,9.525 99.568,13.589
Drill Drawing:
  text ".Legend" at 82.347,-8.484 h5.08